# Altium PCB Kasli-DIOT.PCBDOC (part 23 of 23)
Units mm, origin at the board's own origin, x right, y up, seen from the top; angles counter-clockwise.
Board outline 222.9 x 100 mm, 10 copper layers (TopLayer, Layer 2, Layer 3, Layer 4, Layer 5, Layer 6, Layer 7, layer 8, Layer 9, BottomLayer), stack 1.564 mm thick; 977 components, 900 nets, 4676 pads, 2725 vias.
Unrouted connection lines stored in the file: 17.
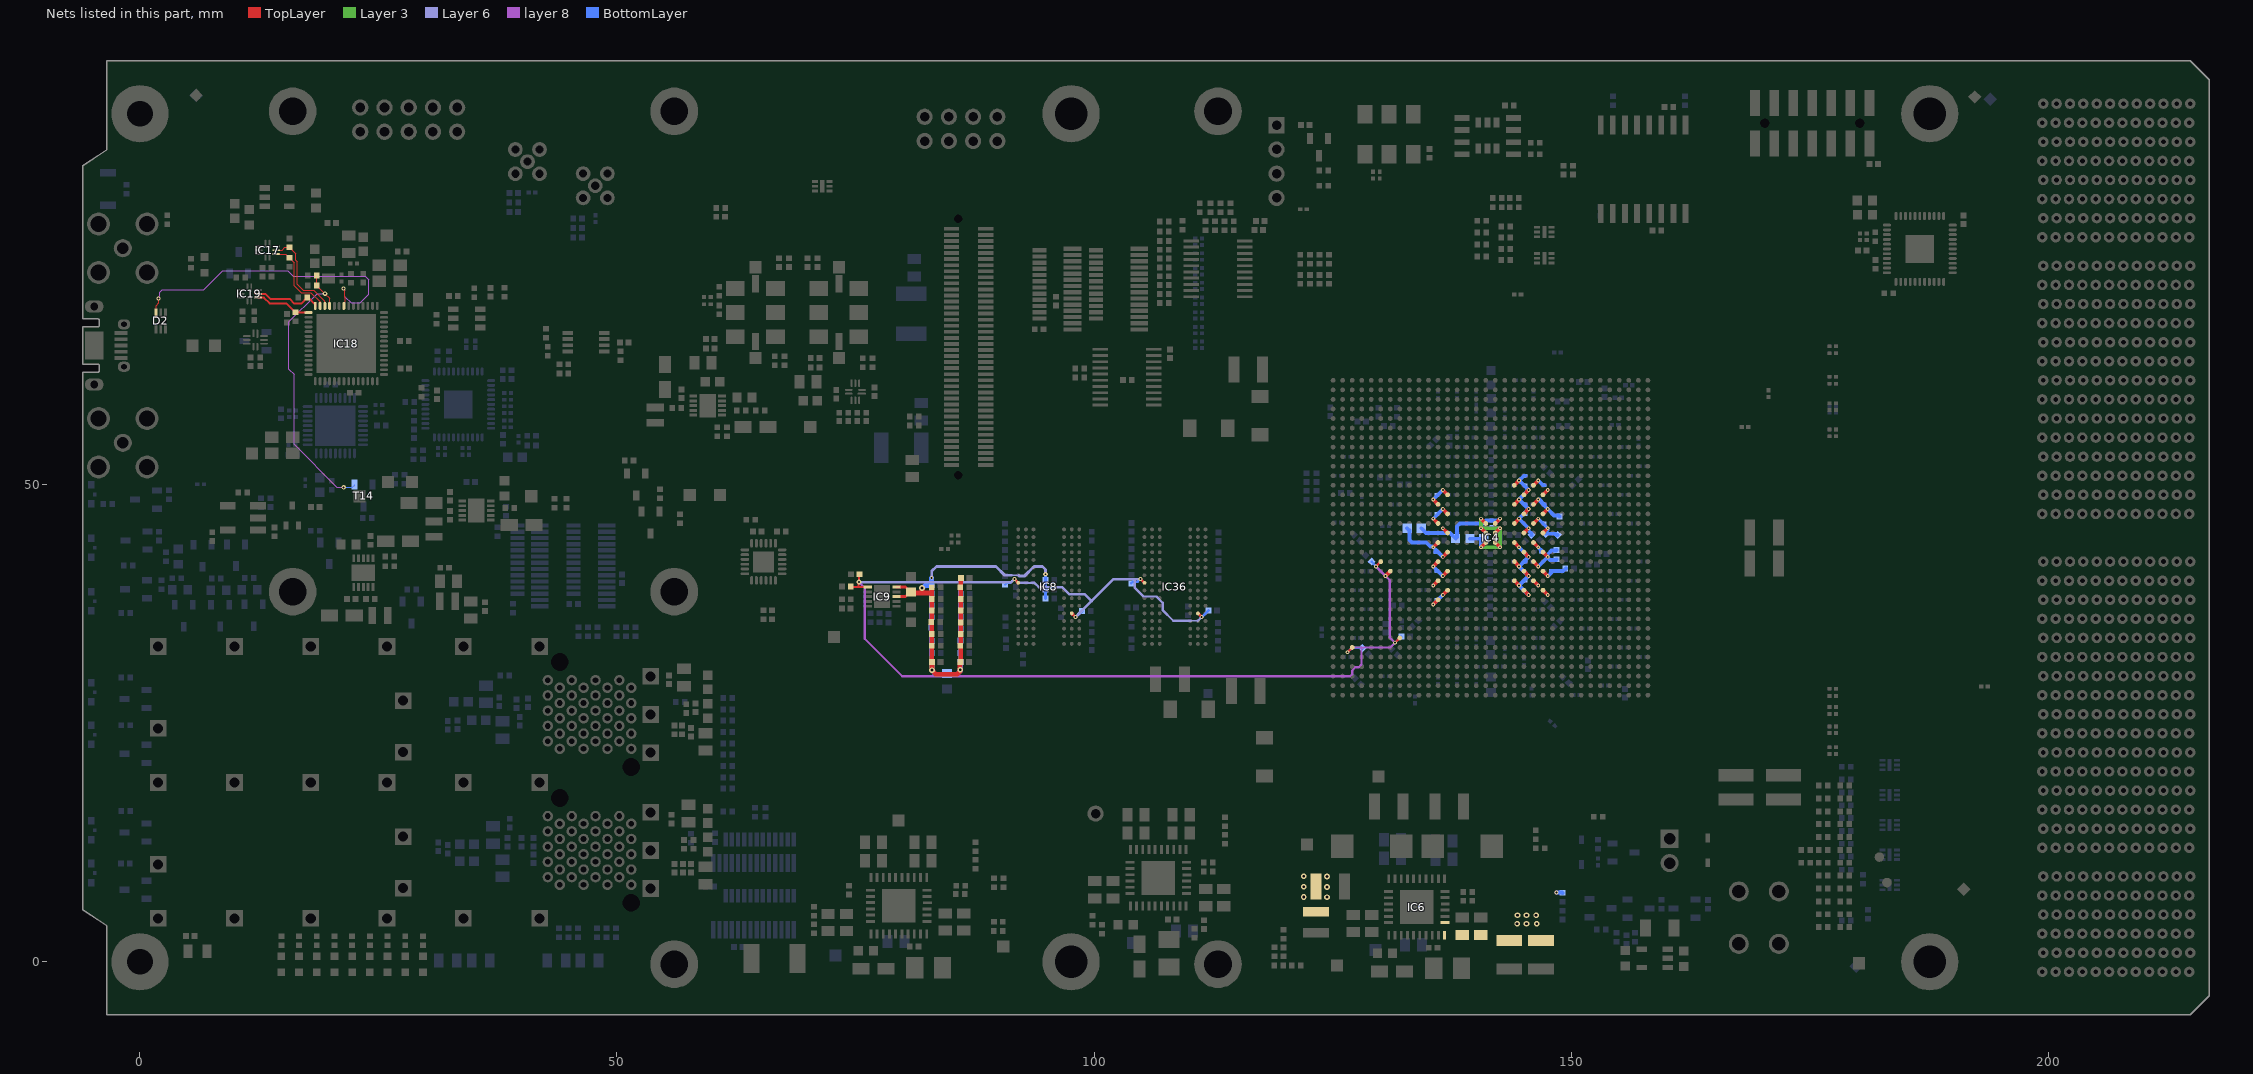
[diagram p29: the nets of this part, all layers, seen from the top]

## Via types
v1: diameter 0.4, hole 0.2, TopLayer to BottomLayer, tented both sides, 1723 vias
v2: diameter 0.5, hole 0.2, TopLayer to BottomLayer, tented both sides, 524 vias
v3: diameter 0.6, hole 0.3, TopLayer to BottomLayer, tented both sides, 172 vias
v4: diameter 0.6, hole 0.3, TopLayer to BottomLayer, 113 vias
v5: diameter 0.5, hole 0.2, TopLayer to BottomLayer, 107 vias
v6: diameter 0.4, hole 0.2, TopLayer to BottomLayer, 67 vias
v7: diameter 0.5, hole 0.25, TopLayer to BottomLayer, tented both sides, 12 vias
v8: diameter 0.8, hole 0.5, TopLayer to BottomLayer, tented both sides, 7 vias

## Nets (pads, with @x,y where several pads share a name; then routed paths per layer and width w, separated by ;. In a path a pad name is that pad's centre, name@x,y a point inside that pad or via, vN(x,y) a via of type N, cw(c..) or ccw(c..) an arc to the next point about the centre after c; other vN are vias at no path point) (continued)
USB_D_R_P: D2.6 IC18.8 | length 33.2
  TopLayer w0.129: D2.6@1.681,67.984 1.681,68.792 1.961,69.071 1.961,69.496 v6(1.926,69.531) ; v1(21.321,70.574) 21.321,70.528 21.487,70.363 21.487,69.686 21.498,69.675 21.498,69.194 21.376,69.072 IC18.8@21.376,68.758
  layer 8 w0.102: v6(1.926,69.531) 1.926,69.604 2.061,69.739 2.061,70.184 2.331,70.454 6.69,70.454 8.665,72.429 15.506,72.429 16.085,71.85 23.631,71.85 23.99,71.491 23.99,69.978 23.083,69.071 22.135,69.071 21.486,69.72 21.486,70.365 21.321,70.53 v1(21.321,70.574)
USB_TCK: IC17.9 IC18.12 R195.1 | length 9.8
  TopLayer w0.125: IC17.9@14.271,74.587 14.895,74.587 15.187,74.879 R195.1@15.657,74.879 16.336,74.2 16.336,73.55 16.486,73.4 16.486,71.041 17.131,70.396 18.197,70.396 19.376,69.217 IC18.12@19.376,68.758
USB_TDI_DO: IC17.8 IC18.13 R196.1 | length 8.5
  TopLayer w0.125: IC17.8@14.271,74.187 15.257,74.187 R196.1@15.657,73.787 16.186,73.258 16.186,70.883 16.927,70.142 17.898,70.142 18.876,69.164 IC18.13@18.876,68.758
USB_TDO_DI: IC18.14 IC19.9 R197.1 | length 7.1
  TopLayer w0.2: IC19.9@12.366,70.015 13.121,70.015 13.658,69.478 15.686,69.478 16.165,68.999 16.889,68.999 R197.1@17.524,69.634 17.627,69.634 18.376,68.885 IC18.14@18.376,68.758
USB_TMS: IC18.15 IC19.8 R198.1 | length 6
  TopLayer w0.2: IC19.8@12.366,69.615 12.99,69.615 13.58,69.025 15.339,69.025 R198.1@16.292,68.072 16.306,68.058 IC18.15@17.676,68.058
VCCAUX: C55.2 C98.2 C117.2 C118.2 C119.2 C151.2 C152.2 C158.2 C235.2 C240.2 C313.2 C314.2 C368.2 C369.2 C370.2 C371.2 C372.2 IC4.AA13 IC4.AA23 IC4.AB12 IC4.AB22 IC4.AC13 IC4.AC23 IC4.AD12 IC4.M22 IC4.N13 IC4.N23 IC4.P12 IC4.P22 IC4.R13 IC4.R23 IC4.T12 IC4.T22 IC4.U13 IC4.U23 IC4.V12 IC4.V22 IC4.W13 IC4.W23 IC4.Y12 IC4.Y22 L4.1 L7.2 | length 44.1
  TopLayer w0.4: v1(135.561,37.45) IC4.AD12@136.061,37.95 ; v1(135.561,39.45) IC4.AB12@136.061,39.95 ; v1(135.561,41.45) IC4.Y12@136.061,41.95 ; v1(135.561,43.45) IC4.V12@136.061,43.95 ; v1(135.561,46.45) IC4.T12@136.061,45.95 ; v1(135.561,48.45) IC4.P12@136.061,47.95 ; v1(136.561,38.45) IC4.AC13@137.061,38.95 ; v1(136.561,40.45) IC4.AA13@137.061,40.95 ; v1(136.561,42.45) IC4.W13@137.061,42.95 ; v1(136.561,45.45) IC4.U13@137.061,44.95 ; v1(136.561,47.45) IC4.R13@137.061,46.95 ; v1(136.561,49.45) IC4.N13@137.061,48.95 ; IC4.AB22@146.061,39.95 v1(146.561,39.45) ; IC4.Y22@146.061,41.95 v1(146.561,41.45) ; IC4.V22@146.061,43.95 v1(146.561,43.45) ; IC4.T22@146.061,45.95 v1(146.561,46.45) ; IC4.P22@146.061,47.95 v1(146.561,48.45) ; IC4.M22@146.061,49.95 v1(146.561,50.45) ; IC4.AC23@147.061,38.95 v1(147.561,38.45) ; IC4.AA23@147.061,40.95 v1(147.561,40.45) ; IC4.W23@147.061,42.95 v1(147.561,42.45) ; IC4.U23@147.061,44.95 v1(147.561,45.45) ; IC4.R23@147.061,46.95 v1(147.561,47.45) ; IC4.N23@147.061,48.95 v1(147.561,49.45)
  BottomLayer w0.4: L4.1@132.811,45.45 133.061,45.2 133.061,44.21 133.321,43.95 134.827,43.95 135.237,43.54 135.471,43.54 v1(135.561,43.45) C118.2@135.936,43.075 ; v1(135.561,37.45) v1(136.561,38.45) ; v1(135.561,41.45) v1(136.561,40.45) 136.528,40.45 136.361,40.617 136.028,40.95 C119.2@135.911,40.95 ; v1(135.561,46.45) v1(136.561,47.45) ; v1(135.561,48.45) v1(136.561,49.45) ; C118.2@135.811,42.95 136.061,42.95 136.361,42.65 v1(136.561,42.45) ; v1(146.561,41.45) v1(147.561,42.45) ; v1(146.561,43.45) 146.711,43.3 146.861,43.15 146.861,42.975 C369.2@146.886,42.975 ; v1(146.561,46.45) v1(147.561,45.45) 147.561,45.231 147.354,45.024 C152.2@147.354,44.868 148.324,44.868 148.449,44.743 C151.2@148.604,44.743 ; v1(146.561,50.45) 147.061,49.95 C372.2@147.211,49.95 ; C371.2@147.211,47.95 147.186,47.95 146.686,48.45 v1(146.561,48.45) v1(147.561,47.45) 148.226,46.785 148.676,46.785 C314.2@148.786,46.675 ; v1(147.561,40.45) 147.609,40.45 147.911,40.752 C368.2@147.911,40.95 149.189,40.95 C240.2@149.46,41.221 ; C158.2@148.486,42.2 148.411,42.125 147.811,42.125 147.561,42.375 v1(147.561,42.45) ; C313.2@148.486,43.175 148.421,43.11 147.942,43.11 147.561,42.729 v1(147.561,42.45)
  other v3: 124.411,6.775 121.986,6.8 124.411,7.85 121.986,7.875 124.411,8.95 121.986,8.975
VCCBRAM: C56.2 C99.2 C120.2 C121.2 C122.2 C132.2 C133.2 C145.2 C351.2 C353.2 C354.2 IC4.AA21 IC4.AB20 IC4.AC21 IC4.M20 IC4.N21 IC4.P20 IC4.R21 IC4.T20 IC4.U21 IC4.V20 IC4.W21 IC4.Y20 IC6.1 IC6.32 R31.2 | length 25.1
  TopLayer w0.4: IC4.AB20@144.061,39.95 v1(144.561,39.45) ; IC4.Y20@144.061,41.95 v1(144.561,41.45) ; IC4.V20@144.061,43.95 v1(144.561,43.45) ; IC4.T20@144.061,45.95 v1(144.561,46.45) ; IC4.P20@144.061,47.95 v1(144.561,48.45) ; IC4.M20@144.061,49.95 v1(144.561,50.45) ; IC4.AC21@145.061,38.95 v1(145.561,38.45) ; IC4.AA21@145.061,40.95 v1(145.561,40.45) ; IC4.W21@145.061,42.95 v1(145.561,42.45) ; IC4.U21@145.061,44.95 v1(145.561,45.45) ; IC4.R21@145.061,46.95 v1(145.561,47.45) ; IC4.N21@145.061,48.95 v1(145.561,49.45)
  BottomLayer w0.4: v1(144.561,43.45) v1(145.561,42.45) 145.236,42.125 145.236,41.95 C122.2@145.211,41.95 145.072,41.95 144.572,41.45 v1(144.561,41.45) v1(145.561,40.45) v1(144.561,39.45) v1(145.561,38.45) ; C99.2@145.211,47.95 C99.2@145.236,47.95 ; C354.2@145.236,50.95 145.061,50.95 v1(144.561,50.45) 145.06,49.951 145.06,49.949 145.558,49.45 v1(145.561,49.45) v1(144.561,48.45) v1(145.561,47.45) v1(144.561,46.45) v1(145.561,45.45) 145.561,45.192 145.854,44.899 C145.2@145.854,44.743 ; v1(148.486,7.25) 149.086,7.25 R31.2@149.111,7.225
  other v3: 144.356,3.987 145.331,3.987 146.415,3.987 144.392,4.876 145.342,4.876 146.342,4.876
VREF_DDR3: C162.2 C163.2 C164.2 C165.2 C166.2 C167.2 C168.2 C169.2 C177.2 IC4.AA7 IC4.AH8 IC4.AJ3 IC4.Y6 IC8.H1 IC8.M8 IC9.6 IC36.H1 IC36.M8 | length 136.5
  TopLayer w0.2: C177.2@74.455,39.275 75.33,39.275 ; v2@75.33,39.775 75.33,39.275 ; v2(75.355,39.8) 75.355,40.544 C162.2@75.436,40.625 ; IC9.6@76.28,39.275 75.33,39.275
  TopLayer w0.24: v1(126.561,32.45) IC4.AJ3@127.061,32.95 ; v1(129.561,41.45) IC4.Y6@130.061,41.95 ; v1(131.561,33.45) IC4.AH8@132.061,33.95
  TopLayer w0.3: v1(91.661,40.122) IC8.H1@92.061,39.722 ; IC8.M8@97.661,36.528 v1(98.061,36.128) ; v1(104.886,40.122) IC36.H1@105.286,39.722 ; IC36.M8@110.886,36.528 v1(111.286,36.128)
  TopLayer w0.4: v1(130.561,40.45) IC4.AA7@131.061,40.95
  Layer 6 w0.2: 93.063,39.723 93.428,39.723 ; 110.15,35.747 110.892,35.747
  Layer 6 w0.254: v2(75.355,39.8) 91.339,39.8 v1(91.661,40.122) 92.063,39.72 93.06,39.72 ; 93.428,39.723 93.43,39.725 93.761,39.725 94.211,39.275 96.661,39.275 97.392,38.544 99.017,38.544 99.747,37.814 ; v1(98.061,36.128) 99.747,37.814 ; 104.286,40 104.286,39.2 105.194,38.292 106.543,38.292 107.195,37.64 107.195,36.866 108.311,35.75 110.136,35.75 110.145,35.741 ; v1(104.886,40.122) 102.056,40.122 99.747,37.814 ; 110.892,35.747 111.273,36.128 v1(111.286,36.128)
  layer 8 w0.24: v2(75.355,39.8) 75.961,39.194 75.961,33.863 79.899,29.925 126.834,29.925 127.06,30.152 127.06,30.543 127.387,30.87 127.749,30.87 128.036,31.157 128.036,32.95 ; v1(126.561,32.45) 126.591,32.45 127.091,32.95 128.036,32.95 ; v1(129.561,41.45) v1(130.561,40.45) 131.008,40.003 131.008,34.003 v1(131.561,33.45) 131.061,32.95 128.036,32.95
  BottomLayer w0.24: C164.2@90.686,39.55 90.876,39.74 91.257,39.74 91.639,40.122 v1(91.661,40.122) ; C166.2@103.915,39.675 104.092,39.851 104.585,39.851 104.856,40.122 v1(104.886,40.122) ; v1(126.561,32.45) 127.019,32.908 128.005,32.908 C168.2@128.105,32.808 ; C163.2@129.104,41.957 129.104,41.932 129.561,41.475 v1(129.561,41.45) ; v1(131.561,33.45) 132.03,33.919 132.032,33.919 C167.2@132.222,34.109
  BottomLayer w0.3: v1(98.061,36.128) 98.071,36.137 98.123,36.137 C169.2@98.761,36.775 ; v1(111.286,36.128) 111.296,36.137 111.323,36.137 C165.2@112.011,36.825
VTT_DDR3: C173.2 C174.2 C471.2 C472.2 C473.2 C474.2 C475.2 C476.2 C477.2 C478.2 IC9.3 IC9.5 R101.2 R102.2 R103.2 R104.2 R105.2 R106.2 R107.2 R108.2 R109.2 R110.2 R111.2 R112.2 R113.2 R114.2 R115.2 R116.2 R117.2 R118.2 R119.2 R120.2 R121.2 R122.2 R123.2 R124.2 R126.2 R298.2 | length 68.8
  TopLayer w0.3: IC9.3@79.28,38.275 80.251,38.275 C174.2@80.747,38.771 ; IC9.5@79.28,39.275 80.242,39.275 C174.2@80.747,38.771 ; C174.2@80.797,38.771 C174.2@80.747,38.771
  TopLayer w0.5: C174.2@80.797,38.771 80.917,38.65 81.958,38.65 ; v3(81.961,39.175) 81.958,39.172 81.958,38.65 ; R118.2@82.971,39.26 82.999,39.232 82.999,38.65 ; C477.2@86.051,40.212 86.033,40.194 86.033,31.459 C472.2@86.014,31.441 85.954,31.381 85.954,30.444 85.661,30.15 83.383,30.15 83.383,30.189 83.027,30.545 v3(83.027,30.572) C475.2@83.027,31.431 82.999,31.459 82.999,38.65 ; 81.958,38.65 82.999,38.65
  Layer 6 w0.2: 91.361,40.524 91.493,40.524 91.495,40.522 92.089,40.522 92.111,40.5
  Layer 6 w0.3: v1(82.986,40.25) 82.986,40.95 83.486,41.45 89.711,41.45 90.637,40.524 91.361,40.524 ; 92.111,40.5 92.188,40.423 92.692,40.423 93.719,41.45 94.586,41.45 94.911,41.125 v5(94.911,40.625)
  BottomLayer w0.3: v5(94.911,40.625) 94.924,40.612 94.924,40.013 C471.2@94.936,40 94.926,39.99 94.926,38.085 R298.2@94.916,38.075
  BottomLayer w0.5: v3(81.961,39.175) 81.988,39.175 82.255,39.442 82.912,39.442 C473.2@82.972,39.502 ; C473.2@82.972,39.502 C473.2@82.972,39.502 ; v1(82.986,40.25) 82.971,40.235 C473.2@82.972,39.502 ; C476.2@86.051,40.212 86.033,40.194 86.033,31.459 C478.2@86.014,31.441 86.014,30.504 85.661,30.15 83.383,30.15 83.046,30.487 83.046,30.553 v3(83.027,30.572) 83.027,31.376 82.999,31.404 82.999,32.352 R115.2@82.971,32.38 R119.2@82.971,37.36 R111.2@82.971,38.605 C473.2@82.972,39.502
  other v3: 85.982,30.611
VUSB_PRESENT: IC18.11 R200.2 R201.2 T14.1 | length 30.2
  TopLayer w0.125: R201.2@18.54,71.92 18.54,70.884 19.389,70.035 v2(19.392,70.035) 19.876,69.551 IC18.11@19.876,68.758
  layer 8 w0.125: v2(19.392,70.035) 18.571,70.035 15.611,67.075 15.611,62.125 16.161,61.575 16.161,54.225 20.649,49.738 v2(21.348,49.738)
  BottomLayer w0.125: v2@21.348,49.702 v2(21.348,49.738) 22.248,49.738 22.486,49.975 T14.1@22.486,50.025
XADC_GND: C51.1 C339.1 IC4.T17 IC4.U17 IC4.U18 IC4.V17 IC4.V18 L5.2 | length 15
  TopLayer w0.4: v1(140.561,43.45) IC4.V17@141.061,43.95 ; v1(140.561,45.45) IC4.U17@141.061,44.95 ; v1(140.561,46.45) IC4.T17@141.061,45.95 ; IC4.V18@142.061,43.95 v1(142.561,43.45) ; IC4.U18@142.061,44.95 v1(142.561,45.45)
  Layer 3 w0.4: v1(140.561,43.45) v1(142.561,43.45) v1(142.561,45.45) v1(140.561,45.45) v1(140.561,46.45)
  BottomLayer w0.4: C339.1@139.411,44.35 L5.2@140.861,44.35 140.561,44.05 v1(140.561,43.45) ; v1(140.561,45.45) v1(142.561,45.45)
XADC_VCC: C51.2 C339.2 IC4.T18 L4.2 | length 11
  TopLayer w0.4: IC4.T18@142.061,45.95 v1(142.561,46.45)
  BottomLayer w0.4: L4.2@134.311,45.45 134.811,44.95 137.311,44.95 C339.2@137.911,44.35 138.061,44.5 138.061,45.657 138.354,45.95 140.768,45.95 141.073,46.255 C51.2@141.657,46.255 142.366,46.255 v1(142.561,46.45)
pads on no net: D1.3 D4.5 D6.5 D15.6 FTG1.1 FTG2.1 FTG3.1 FTG4.1 FTG5.1 FTG6.1 IC1.1 IC1.7 IC1.8 IC1.11 IC1.13 IC1.21 IC1.28 IC1.33 IC2.2 IC2.3 IC2.4 IC2.9 IC2.11 IC2.12 IC2.13 IC2.14 IC2.15 IC2.27 IC2.30 IC2.33 IC2.34 IC2.35 IC3.4 IC4.A2 IC4.A3 IC4.A4 IC4.A5 IC4.A7 IC4.A8 IC4.A9 IC4.A10 IC4.A25 IC4.A27 IC4.A28 IC4.A29 IC4.A30 IC4.A32 IC4.A33 IC4.A34 IC4.AA4 IC4.AB11 IC4.AC11 IC4.AD8 IC4.AD9 IC4.AD10 IC4.AD11 IC4.AD23 IC4.AE6 IC4.AE8 IC4.AE10 IC4.AE11 IC4.AF4 IC4.AF7 IC4.AF9 IC4.AF10 IC4.AF12 IC4.AF24 IC4.AG7 IC4.AG9 IC4.AG10 IC4.AG11 IC4.AG12 IC4.AH9 IC4.AH11 IC4.AJ5 IC4.AJ24 IC4.AJ25 IC4.AJ26 IC4.AJ30 IC4.AK11 IC4.AK25 IC4.AK26 IC4.AK27 IC4.AK31 IC4.AL24 IC4.AL25 IC4.AL27 IC4.AM4 IC4.AM25 IC4.AM26 IC4.AN26 IC4.AN31 IC4.AP25 IC4.AP26 IC4.AP31 IC4.B1 IC4.B2 IC4.B4 IC4.B5 IC4.B6 IC4.B7 IC4.B9 IC4.B10 IC4.B11 IC4.B25 IC4.B26 IC4.B27 IC4.B29 IC4.B30 IC4.B31 IC4.B32 IC4.B34 IC4.C1 IC4.C2 IC4.C3 IC4.C4 IC4.C6 IC4.C7 IC4.C8 IC4.C9 IC4.C11 IC4.C26 IC4.C27 IC4.C28 IC4.C29 IC4.C31 IC4.C32 IC4.C33 IC4.C34 IC4.D1 IC4.D3 IC4.D4 IC4.D5 IC4.D6 IC4.D8 IC4.D9 IC4.D10 IC4.D11 IC4.D24 IC4.D25 IC4.D26 IC4.D28 IC4.D29 IC4.D30 IC4.D31 IC4.D33 IC4.D34 IC4.E1 IC4.E2 IC4.E3 IC4.E5 IC4.E6 IC4.E7 IC4.E8 IC4.E10 IC4.E11 IC4.E25 IC4.E26 IC4.E27 IC4.E28 IC4.E30 IC4.E31 IC4.E32 IC4.E33 IC4.F4 IC4.F5 IC4.F7 IC4.F8 IC4.F9 IC4.F10 IC4.F24 IC4.F25 IC4.F27 IC4.F28 IC4.F29 IC4.F30 IC4.F32 IC4.F33 IC4.F34 IC4.G14 IC4.G20 IC4.H12 IC4.H14 IC4.H20 IC4.L7 IC4.L23 IC4.M4 IC4.M5 IC4.M6 IC4.M7 IC4.M9 IC4.M26 IC4.N3 IC4.P6 IC4.P9 IC4.R3 IC4.R7 IC4.R11 IC4.T2 IC4.T3 IC4.T4 IC4.T5 IC4.T24 IC4.U2 IC4.U7 IC4.U24 IC4.V24 IC4.V31 IC4.V32 IC4.V33 IC4.V34 IC4.W5 IC4.W24 IC4.W25 IC4.W28 IC4.W29 IC4.Y11 IC4.Y25 IC4.Y26 IC4.Y28 IC8.J1 IC8.J9 IC8.L1 IC8.L9 IC8.M7 IC10.4 IC11.4 IC16.3 IC16.4 IC16.5 IC16.6 IC16.11 IC16.12 IC16.13 IC18.17 IC18.18 IC18.19 IC18.20 IC18.25 IC18.26 IC18.29 IC18.30 IC18.34 IC18.35 IC18.37 IC18.38 IC18.39 IC18.40 IC18.54 IC24.11 IC24.14 IC24.19 IC25.11 IC25.14 IC25.19 IC26.4 IC31.7 IC33.1 IC33.11 IC33.13 IC33.19 IC33.20 IC33.21 IC33.24 IC33.25 IC33.28 IC33.33 IC33.35 IC33.36 IC34.1 IC34.2 IC34.3 IC34.4 IC34.11 IC34.14 IC34.19 IC34.20 IC34.28 IC36.J1 IC36.J9 IC36.L1 IC36.L9 IC36.M7 IC37.4 IC38.1 IC38.11 IC38.13 IC38.14 IC38.15 IC38.16 J5.16 J5.22 J5.24 J5.28 J5.30 J5.34 J5.36 J5.38 J5.40 J5.44 J5.46 J5.48 J5.50 J5.62 J5.73 J5.75 J5.P1 J5.P2 J8.12 J8.14 J8.15 J8.16 J14.E4 J14.F4 J14.K2 J19.MECH1 J19.MECH2 J19.MECH3 J19.MECH4 J23.4 J23.PastePad J33.A1 J33.B1 J33.B2 J33.C2 J33.D1 J33.E1 J33.E2 J33.F2 J33.G1 J33.H1 J33.H2 J33.I2 J33.J1 J33.K1 J33.K2 J33.L2 LD11.3 LD13.3 LD14.3 LD15.3 LD16.3 LD17.3 LD18.3 OSC2.1

## Polygon pours and split planes (outlines as drawn)
no net on TopLayer "Copper_balancing" (solid, pour order 466): -3.089,93.175 216.2,93.175 216.95,92.425 216.95,-3.31 -3.089,-3.31 -3.089,2.625 -5.389,4.925 -5.389,82.8 -3.089,85.1
P12V0 on TopLayer "P12V0_L01_P351" (solid, remove dead copper, pour order 351): 175.7,1.875 174.063,3.512 174.063,8.288 173.298,9.054 165.879,9.054 163.461,6.636 163.461,2.312 163.461,-2.625 215.886,-2.625 215.911,-2.65 215.911,0.95 198.8,0.95 195.175,4.574 185.096,4.574 182.397,1.875
P2V5_LDO on TopLayer "P2V5_LDO_L01_P398" (solid, remove dead copper, pour order 398): 60.011,61.8 60.011,60.05 60.761,59.3 60.761,58.8 64.011,58.8 64.261,58.55 65.511,58.55 66.261,57.8 70.511,57.8 70.511,59.8 67.761,59.8 65.761,61.8
P3V3_USB on TopLayer "P3V3_USB_L01_P352" (solid, pour order 352): 17.374,81.652 18.92,80.106 19.592,80.106 20.011,79.687 20.011,79.579 20.011,76.55 14.737,76.55 14.737,81.652
NetC202_2 on TopLayer "NETC202_2_L01_P353" (solid, remove dead copper, pour order 353): 14.011,82.8 8.011,82.8 8.011,78.3 14.011,78.3
P1V2 on TopLayer "TopLayer-P1V2" (solid, remove dead copper, pour order 460): 24 vertices, not listed, extent 109.161,4.067 122.686,56.825
P12V0 on TopLayer "P12V0_L01_P426" (solid, remove dead copper, pour order 426): 17 vertices, not listed, extent 76.898,-2.392 82.798,3.375
GND on TopLayer "GND_L01_P465" (solid, pour order 465): 137.386,16.849 137.386,13.449 139.133,11.703 139.133,10.925 140.023,10.035 143.161,10.035 143.636,10.509 143.636,14.397 140.121,17.912 138.449,17.912
P1V0 on TopLayer "P1V0" (solid, remove dead copper, pour order 350): 28 vertices, not listed, extent 130.061,8.242 142.311,27.122
GND on TopLayer "GND_L01_P464" (solid, pour order 464): 127.786,17.95 130.161,17.95 130.561,17.55 130.561,13.759 129.026,12.224 129.026,10.639 128.212,9.825 125.286,9.825 124.411,10.7 124.411,14.575
P12V0 on TopLayer "P12V0_L01_P419" (solid, pour order 419): 17 vertices, not listed, extent 131.186,-2.525 137.086,3.242
P3V3_LDO2 on TopLayer "P3V3_LDO2_L01_P399" (solid, pour order 399): 42.011,46.55 42.325,46.864 42.325,49.736 40.011,52.05 37.011,52.05 37.011,46.55
P12V0 on TopLayer "P12V0_L01_P420" (solid, pour order 420): 21 vertices, not listed, extent 104.098,0.533 109.999,6.3
MGTAVCC on TopLayer "TopLayer-MGTAVCC" (solid, remove dead copper, pour order 338): 22 vertices, not listed, extent 99.761,11.3 112.211,57.925
P3V3_LDO1 on TopLayer "P3V3_LDO1_L01_P400" (solid, pour order 400): 23.318,49.867 24.38,48.805 24.38,47.694 23.536,46.85 23.536,43.49 23.101,43.054 22.207,43.054 21.876,43.385 21.876,44.513 20.214,46.175 19.521,46.175 17.049,48.617 17.049,49.055 17.894,49.867
P1V5 on TopLayer "TopLayer-P1V5" (solid, remove dead copper, pour order 459): 19 vertices, not listed, extent 76.861,4.627 104.461,34
P1V8 on TopLayer "P1V8_L01_P438" (solid, remove dead copper, pour order 438): 131.323,4.259 131.323,3.531 131.019,3.227 131.019,2.062 130.524,1.567 122.419,1.567 121.686,2.3 121.686,3.867 129.774,3.867 130.174,4.267
P5V0_CLK on TopLayer "P5V0_CLK_L01_P454" (solid, remove dead copper, pour order 454): 82.036,4.392 82.036,3.664 82.341,3.36 82.341,2.403 82.908,1.836 87.747,1.836 87.811,1.9 87.811,4 83.586,4 83.186,4.4
GND on TopLayer "GND_L01_P446" (solid, pour order 446): 170.136,46.925 170.136,39.825 173.011,39.825 172.986,46.925
P2V5 on TopLayer "P2V5_L01_P440" (solid, pour order 440): 166.911,46.926 166.911,39.85 169.836,39.85 169.836,46.926
P3V3 on TopLayer "P3V3_L01_P427" (solid, remove dead copper, pour order 427): 77.036,4.392 77.036,3.664 76.731,3.36 76.731,2.403 76.164,1.836 71.325,1.836 71.261,1.9 71.261,4 75.486,4 75.886,4.4
P2V5 on TopLayer "P2V5_L01_P416" (solid, pour order 416): 77.114,8.375 77.161,13.45 81.961,13.45 81.961,8.394
VCCBRAM on TopLayer "VCCBRAM_L01_P418" (solid, remove dead copper, pour order 418): 136.323,5.575 136.323,3.5 136.598,3.225 136.598,2.137 137.511,1.225 148.411,1.225 148.736,1.55 148.736,4.95 148.111,5.575
GND on TopLayer "GND_L01_P417" (solid, remove dead copper, pour order 417): 198.861,47.15 198.861,41.225 216.636,41.225 216.636,47.15
STRIP1 on TopLayer "esd1" (solid, pour order 406): 214.394,-4.55 214.411,-4.55 215.651,-3.31 116.861,-3.31 116.861,-4.55
CHASSIS on TopLayer "NONET_L04_P-001" (solid, remove dead copper, pour order 413): -2.778,-3.389 -2.778,3.29 4.211,3.29 4.211,-3.36
STRIP2 on TopLayer "STRIP2_L01_P408" (solid, pour order 408): 79.794,-4.55 96.861,-4.55 96.861,-3.27 41.861,-3.27 41.861,-4.55
CHASSIS on TopLayer "esd1" (solid, pour order 404): -2.82,-3.27 36.861,-3.27 36.861,-4.5 -2.82,-4.5
no net on BottomLayer "Copper_balancing" (solid, pour order 467): -3.449,92.485 216.59,92.485 216.59,-3.196 -3.449,-3.196 -3.449,3.004 -5.749,5.304 -5.749,82.534 -3.449,84.834
STRIP2 on BottomLayer "esd1" (solid, pour order 403): 79.794,-4.55 96.861,-4.55 96.861,-3.281 41.861,-3.281 41.861,-4.55
P1V0 on BottomLayer "P1V0_L10_P435" (solid, pour order 435): 134.748,16.525 136.378,14.895 136.378,9.791 136.087,9.5 132.186,9.5 131.561,10.125 131.561,14.831 133.255,16.525 133.268,16.525
STRIP1 on BottomLayer "STRIP1_L10_P402" (solid, pour order 402): 214.394,-4.55 214.411,-4.55 215.651,-3.31 116.861,-3.31 116.861,-4.55
GND on BottomLayer "GND_L10_P407" (solid, remove dead copper, pour order 407): 198.861,47.15 198.861,41.225 216.636,41.225 216.636,47.15
CHASSIS on BottomLayer "NONET_L04_P-001" (solid, remove dead copper, pour order 405): -2.778,3.29 -2.778,-3.4 4.211,-3.4 4.211,3.3 4.201,3.3
CHASSIS on BottomLayer "esd1" (solid, pour order 401): -2.82,-3.28 36.861,-3.28 36.861,-4.5 -2.82,-4.5
NetC23_2 on BottomLayer "NETC23_2_L10_P383" (solid, pour order 383): 18.011,54.3 16.292,54.3 16.292,51.55 17.511,50.05 19.511,50.05 21.011,52.3 21.011,53.8
no net on layer 8 "Copper_balancing" (solid, pour order 458): -3.089,93.175 216.2,93.175 216.95,92.425 216.95,-3.31 -3.089,-3.31 -3.089,2.625 -5.389,4.925 -5.389,82.8 -3.089,85.1
P12V0 on layer 8 "layer 8-P12V0" (solid, remove dead copper, pour order 455): 22 vertices, not listed, extent 66.761,-2.275 215.911,9.849
P1V0 on layer 8 "P1V0_L08_P450" (solid, pour order 450): 144.561,49.45 144.561,22.3 138.286,16.025 138.286,11.125 136.911,9.75 132.561,9.75 130.226,12.085 130.226,24.39 131.561,25.725 131.561,49.45
MGTAVTT_G11 on layer 8 "MGTAVTT_G11_L08_P448" (solid, pour order 448): 126.586,61.963 126.586,54.25 147.446,54.25 147.446,61.908
no net on Layer 6 "Copper_balancing" (solid, pour order 462): -3.089,93.175 216.2,93.175 216.95,92.425 216.95,-3.31 -3.089,-3.31 -3.089,2.625 -5.389,4.925 -5.389,82.8 -3.089,85.1
P12V0 on Layer 6 "Layer 6-P12V0" (solid, pour order 461): 26 vertices, not listed, extent 76.836,-2.55 215.986,9.65
P3V3_USB on Layer 6 "P3V3_USB_L06_P434" (solid, pour order 434): 12.011,62.364 12.011,61.142 12.901,60.252 14.113,60.262 16,58.375 45.586,58.375 46.611,59.4 46.611,66.4 40.361,72.65 29.522,72.65 23.822,78.35 10.411,78.35 10.306,64.362 10.306,64.069
P5V0_CLK on Layer 6 "Layer 6-P5V0_CLK" (solid, pour order 457): 41.2,41.403 40.784,40.987 24.536,40.987 24.536,-1.95 76.636,-1.95 76.636,1.835 87.236,1.93 87.236,9.475 76.636,9.475 76.636,9.499 59.349,9.499 55.148,6.77 41.2,6.77
MGTAVTT_G11 on Layer 6 "MGTAVTT_G11_L06_P456" (solid, pour order 456): 116.695,57.45 115.64,58.505 115.626,58.505 115.626,60.31 119.667,64.35 141.069,64.35 141.069,57.45 132.321,57.45 117.265,57.45
P1V0 on Layer 6 "P1V0" (solid, remove dead copper, pour order 415): 131.565,13.125 131.686,19.675 139.391,27.38 141.722,27.38 142.311,26.791 142.311,26.58 142.311,21.7 138.561,17.95 136.511,15.9 136.511,13.125
VCCBRAM on Layer 6 "VCCBRAM_L06_P443" (solid, remove dead copper, pour order 443): 146.561,51.45 146.561,48.45 148.586,48.45 148.586,32.012 149.511,30.625 149.511,3.675 148.911,3.075 141.886,3.075 140.561,4.4 140.561,51.45
no net on Layer 3 "Copper_balancing" (solid, pour order 452): -3.139,92.45 216.9,92.45 216.9,-2.975 -3.139,-2.975 -3.139,2.65 -5.439,4.95 -5.439,82.825 -3.139,85.125
VCCAUX on Layer 3 "VCCAUX_L03_P432" (solid, pour order 432): 134.561,36.425 137.561,36.425 137.561,47.45 134.561,47.45
MGTAVTT_G10 on Layer 3 "MGTAVTT_G10_L03_P425" (solid, pour order 425): 135.561,32.775 135.561,27.45 148.611,27.45 148.611,32.825
no net on Layer 5 "Copper_balancing" (solid, pour order 453): -3.139,93.125 216.225,93.125 216.9,92.45 216.9,-2.975 -3.139,-2.975 -3.139,2.65 -5.439,4.95 -5.439,82.825 -3.139,85.125
MGTAVTT_G11 on Layer 5 "MGTAVTT_G11_L05_P433" (solid, pour order 433): 135.561,61.45 135.561,55.45 147.561,55.45 147.417,55.594 147.417,61.472
P2V5 on Layer 2 (split plane): 203 vertices, not listed, extent -5.49,-5.04 216.389,93.939
P1V5 on Layer 2 (split plane): 41 vertices, not listed, extent 76.438,30.127 134.084,50.198
P12V0 on Layer 2 (split plane): 22 vertices, not listed, extent 66.463,-5.04 216.389,11.743
MGTAVTT_G10 on Layer 2 (split plane): 26 vertices, not listed, extent 114.388,23.527 146.834,32.723
MGTAVCC_G11 on Layer 2 (split plane): 146.459,56.408 146.459,54.492 145.519,53.552 136.153,53.552 135.858,53.847 135.825,53.869 135.786,53.877 113.853,53.877 112.613,55.117 112.613,56.683 113.878,57.948 144.919,57.948
MGTAVCC_G10 on Layer 2 (split plane): 45 vertices, not listed, extent 109.113,24.827 146.831,35.482
GND on Layer 4 (split plane): 177 vertices, not listed, extent -5.49,-5.04 216.389,93.939
P3V3 on Layer 7 (split plane): 242 vertices, not listed, extent -5.49,-5.04 133.859,93.939
P1V5 on Layer 7 (split plane): 40 vertices, not listed, extent 76.338,30.902 134.783,48.798
P12V0 on Layer 7 (split plane): 54 vertices, not listed, extent 66.438,-5.04 216.389,8.723
P2V5 on Layer 7 (split plane): 74 vertices, not listed, extent 99.963,1.152 216.389,93.939
P1V0 on Layer 7 (split plane): 20 vertices, not listed, extent 129.938,8.17 147.459,53.348
VCCAUX on Layer 7 (split plane): 48 vertices, not listed, extent 119.538,2.952 148.484,55.348
GND on Layer 9 (split plane): 177 vertices, not listed, extent -5.49,-5.04 216.389,93.939

## Keep-outs
KeepOutLayer:
  drawing of 8345 lines, arcs and shapes, not listed

## Other copper
TopLayer:
  rectangle net GND: 142.185,-2.1 148.211,-1.06
  rectangle net GND: 138.053,4.55 141.011,5.95
  region net GND: 125.73,9.425 125.73,6.467 127.892,6.467 127.892,9.425
  rectangle net GND: 31.911,56.925 34.811,59.9
  rectangle net GND: 18.361,54.075 22.636,58.225
  rectangle net P3V3: 116.569,78.15 117.842,78.808
  rectangle net VCCAUX: 121.461,4.375 125.061,9.625
  pour cut-out: 78.811,9.4 80.261,9.4 80.261,8.516 80.248,8.503 78.813,8.503
  text ".Layer_Name" at 62.053,-24.552 h1.91 r90
  text "1" at 60.953,-28.907 h2.54
Layer 3:
  text "Signal" at 72.213,-24.552 h1.91 r90
  text "3" at 71.113,-28.907 h2.54
Layer 5:
  text "Signal" at 82.383,-24.552 h1.91 r90
  text "5" at 81.283,-28.907 h2.54
Layer 6:
  text "Signal" at 87.761,-24.552 h1.91 r90
  text "6" at 86.161,-28.85 h2.54
layer 8:
  text "Signal" at 97.661,-24.552 h1.91 r90
  text "8" at 96.361,-28.75 h2.54
BottomLayer:
  rectangle net GND: 184.084,72.55 189.175,77.056
  rectangle net GND: 136.926,9.791 140.911,13.775
  region net GND: 131.086,13.775 126.729,13.775 126.729,9.791 131.086,9.791
  rectangle net GND: 132.012,3.931 135.641,7.547
  rectangle net GND: 58.667,57.12 60.328,59.506
  rectangle net GND: 17.951,61.112 25.619,68.297
  rectangle net GND: 34.211,45.8 36.336,48.625
  rectangle net GND: 75.854,36.995 79.661,39.925
  rectangle net GND: 104.892,6.996 108.562,10.619
  rectangle net GND: 77.754,4.032 81.359,7.708
  rectangle net GND: 63.73,40.235 67.061,43.775
  rectangle net GND: 22.061,39.9 24.711,41.7
  rectangle net P3V3_fused: 82.961,56 87.061,57.55
  text ".Layer_Name" at 107.783,-24.552 h1.91 r90
  text "10" at 105.383,-28.907 h2.54
Layer 4 (plane layer: these items are gaps in the copper):
  text "GND" at 77.293,-24.552 h1.91 r90
  text "4" at 76.193,-28.907 h2.54
Layer 9 (plane layer: these items are gaps in the copper):
  text "GND" at 102.703,-24.552 h1.91 r90
  text "9" at 101.603,-28.907 h2.54
Layer 7 (plane layer: these items are gaps in the copper):
  lines w0.2: 119.436,2.775 119.436,12.5 133.961,27.025 133.961,34.175 ; 120.761,67.972 116.083,67.972 99.861,51.75 99.861,48.9 ; 131.886,7.975 131.986,7.975 129.836,10.125 129.836,15.05 136.911,22.125 136.911,52.525 137.836,53.45 146.111,53.45 146.111,38.9 147.561,37.45 ; 134.561,44.122 132.339,44.122 131.586,44.875 119.011,44.875 118.436,45.45 118.436,48.075 117.636,48.875 99.886,48.875 99.861,48.9 ; 137.511,7.975 138.836,9.3 147.561,18.025 147.561,37.45 ; 99.861,48.9 92.261,48.9 89.961,46.6 89.961,43.025 87.961,41.025 78.361,41.025 76.236,38.9 76.236,35.35 76.236,33.925 79.361,30.8 118.611,30.8 119.336,31.525 125.486,31.525 128.486,31.525 131.311,31.525 134.885,35.099 134.885,38.026 134.561,38.35 134.561,45.975 133.086,47.45 132.561,47.45 132.561,52.45 135.561,55.45 147.561,55.45 148.586,54.425 148.586,38.45 147.586,37.45 147.561,37.45
  lines w0.254: 120.761,67.972 120.761,93.95
  lines w0.4: 66.236,-5.7 66.236,0.55 67.261,1.575 77.961,1.575 79.136,2.75 82.761,2.75 83.936,1.575 87.742,1.575 88.917,2.75 113.88,2.75 126.661,2.75 131.886,7.975 ; 131.986,7.975 137.511,7.975 137.936,7.55 161.401,7.55 162.776,8.925 165.924,8.925 173.427,8.925 174.356,7.996 174.356,5.9 177.335,2.92 179.306,0.95 216.911,0.95
  text "PWR" at 92.461,-24.552 h1.91 r90
  text "7" at 90.961,-28.75 h2.54
Layer 2 (plane layer: these items are gaps in the copper):
  lines w0.2: 109.011,30.025 109.011,25.9 110.186,24.725 114.286,24.725 ; 132.151,35.138 135.421,35.138 135.867,35.584 143.106,35.584 143.19,35.5 146.933,35.5 ; 146.933,32.511 146.933,35.511 ; 114.286,24.725 114.286,23.825 114.686,23.425 115.736,23.425 136.886,23.425 142.911,29.45 146.936,29.45 146.936,32.75 146.861,32.825 145.936,32.825 143.884,30.773 136.289,30.773 135.536,30.02 135.536,28.75 133.061,26.275 120.011,26.275 115.836,26.275 114.286,24.725 ; 76.336,33.3 79.611,30.025 123.061,30.025 124.486,31.45 131.161,31.45 131.936,32.225 131.936,34.275 132.132,34.471 132.132,36.521 133.914,38.303 133.914,38.845 133.914,41.635 134.186,41.907 134.186,46.178 132.654,47.71 120.003,47.71 117.413,50.3 107.811,50.3 105.261,47.75 92.236,47.75 87.096,42.61 80.121,42.61 76.336,38.825 76.336,33.3 ; 112.511,55.075 112.511,56.725 113.836,58.05 120.111,58.05 144.961,58.05 146.561,56.45 146.561,54.45 145.561,53.45 136.111,53.45 135.786,53.775 120.611,53.775 113.811,53.775 112.511,55.075
  lines w0.4: 73.511,-5.5 66.261,-5.5 66.261,1.025 68.836,3.6 140.186,3.6 148.531,11.945 168.666,11.945 173.861,6.75 173.861,1.35 174.286,0.925 216.961,0.925
  text "PWR" at 67.133,-24.552 h1.91 r90
  text "2" at 66.033,-28.907 h2.54

## Silkscreen, mask and mechanical layers (free items; w line width, h text height)
TopOverlay:
  drawing of 282 lines, arcs and shapes, not listed
  text "FPGA JTAG" at 170.636,91.964 h1
  text "DC/DC" at 116.736,90.775 h1
  text "P2V5" at 82.486,90.075 h0.7 r90
  text "TP3" at 85.144,90.075 h0.7 r90
  text "TP2" at 87.803,90.075 h0.7 r90
  text "GND" at 90.461,90.075 h0.7 r90
  text "P3V3" at 121.611,89.15 h0.7
  text "SDA" at 114.963,86.017 h0.7
  text "FPGA / Testpoints / (2.5V IOLVL)" at 72.211,85.625 h0.7
  text "SCL" at 114.963,83.392 h0.7
  text "GND" at 82.211,81.875 h0.7 r90
  text "TP1" at 84.869,81.875 h0.7 r90
  text "TP0" at 87.528,81.875 h0.7 r90
  text "P3V3" at 90.186,81.875 h0.7 r90
  text "Variant" at 140.211,81.5 h1
  text "GND" at 114.963,80.984 h0.7
  text "0" at 139.811,79.85 h1
  text "1" at 140.011,78.287 h1
  text "Main" at 62.761,75.8 h1
  text "Helper" at 70.511,75.8 h1
  text "SCL" at 63.511,74.3 h0.8
  text "SCL" at 72.261,74.3 h0.8
  text "Kasli-DIOT v.P_version" at 153.824,73.925 h1.6
  text "WUT ISE / TS / 2026" at 149.825,71.6 h1.6
  text "3" at 120.486,68.4 h1
  text "2" at 121.914,68.4 h1
  text "1" at 123.341,68.4 h1
  text "0" at 124.436,68.4 h1
  text "PCB_VER" at 127.075,68.4 h1 r90
  text "Rx" at 8.445,61.487 h1 r90
  text "Tx" at 6.095,61.437 h1 r90
  text "SDA" at 71.971,61.245 h0.8
  text "SDA" at 63.361,61.175 h0.8
  text "P2V5" at 67.961,53.45 h1
  text "Shared I2C" at 22.511,52.8 h1
  text "LDO" at 68.761,52.35 h1
  text "3V3" at 57.929,51.775 h1
  text "SW" at 61.429,51.775 h1
  text "SDA" at 24.011,51.3 h1
  text "SCL" at 27.511,51.3 h1
  text "I2C" at 54.429,51.275 h1
  text "SDA" at 56.179,50.275 h1
  text "SCL" at 59.429,50.275 h1
  text "P3V3 / LDO2" at 40.011,50.05 h1
  text "P3V3 LDO1" at 13.363,49.31 h1
  text "P3V3" at 74.136,33.65 h0.7
  text "Licensed under CERN-OHL-W v2 or later / https://github.com/sinara-hw/KASLI-DIOT" at 184.711,21.7 h1.5 r90
  text "DC/DC /  force disable" at 164.251,21.674 h0.7
  text "P1V0" at 128.625,20.825 h0.7
  text "IC23" at 161.561,19.25 h0.7
  text "GND" at 99.25,17.2 h0.7
  text "IC14" at 161.561,16.75 h0.7
  text "P2V5" at 78.211,16.05 h0.7
  text "PWM" at 159.061,15.625 h0.7
  text "P12V0" at 159.061,14.45 h0.7
  text "P1V2" at 121.061,13.725 h0.7
  text "P12V0 / GND" at 165.55,11.025 h2.8
  text "CPCIS SCL" at 183.903,10.847 h0.6
  text "FAN" at 156.98,10.65 h0.7 r90
  text "CPCIS SDA" at 185.45,9.033 h0.6
  text "P12V0" at 177.538,1.956 h0.7
  text "WUT ISE 2024" at 33.711,1.875 h1.02
  text "Designed by FS" at 34.971,0.95 h0.6
  text "P1V5" at 89.241,-0.339 h0.7
  text "1V0" at 34.221,-2.107 h0.8 r90
  text "1V2" at 35.971,-2.107 h0.8 r90
  text "1V5" at 37.821,-2.107 h0.8 r90
  text "1V8" at 39.721,-2.107 h0.8 r90
  text "2V5" at 41.621,-2.107 h0.8 r90
  text "3V3" at 43.471,-2.107 h0.8 r90
  text "LED" at 48.721,-2.157 h0.7 r90
  text "PWR / GOOD" at 32.971,-2.357 h0.7 r90
  text "P1V8" at 124.214,-2.397 h0.7
  text "12V0" at 45.221,-2.607 h0.8 r90
  text "USER" at 49.621,-2.657 h0.7 r90
  text "FPGA / DONE" at 47.619,-2.857 h0.7 r90
  text ".Layer_Name" at 59.286,-33.825 h1.91
BottomOverlay:
  drawing of 272 lines, arcs and shapes, not listed
  text "Licensed under CERN-OHL-W v2 or later / https://github.com/sinara-hw/KASLI-DIOT" at 172.714,80.35 h1.5
  text "Kasli-DIOT v.P_version" at 72.562,50.875 h1.5
  text "WUT ISE / TS / 2026" at 76.5,48.65 h1.5
  text ".Layer_Name" at 109.586,-33.025 h1.91
TopPaste:
  text ".Layer_Name" at 63.386,-36.825 h1.91
BottomPaste:
  text ".Layer_Name" at 105.686,-36.025 h1.91
TopSolder:
  rectangle: -2.516,-4.947 216.28,-3.325
  region: 202.898,46.205 202.898,42.705 216.861,42.705 216.861,46.205
  region: 202.898,46.205 202.898,42.705 216.861,42.705 216.861,46.205
  text ".Layer_Name" at 67.036,-39.925 h1.91
BottomSolder:
  rectangle: 77.742,4.067 81.333,7.686
  rectangle: 104.942,6.992 108.533,10.611
  rectangle: 132.029,3.934 135.621,7.553
  rectangle: -2.516,-4.947 216.28,-3.15
  region: 202.898,46.205 202.898,42.705 216.861,42.705 216.861,46.205
  region: 202.898,46.205 202.898,42.705 216.861,42.705 216.861,46.205
  text ".Layer_Name" at 101.836,-39.125 h1.91
Mechanical1:
  lines w0.15: -6,61.8 -6,5.45 -3.5,3.8 -3.5,-5.55 214.9,-5.55 216.9,-3.55 216.9,92.45 214.9,94.45 -3.5,94.45 -3.5,85.1 -6,83.45 -6,67.4 ; -6,62.65 -6,66.55
  lines w0.254: 63.911,-30.225 63.911,-25.145 ; 68.991,-30.225 68.991,-25.145 ; 74.071,-30.225 74.071,-25.145 ; 84.241,-30.225 84.241,-25.145 ; 89.321,-30.225 89.321,-25.145 ; 94.401,-30.225 94.401,-25.145 ; 99.481,-30.225 104.561,-30.225 ; 99.481,-30.225 99.481,-25.145 ; 99.481,-30.225 99.481,-25.145 ; 99.481,-30.225 79.161,-30.225 79.161,-25.145 99.481,-25.145 ; 99.481,-25.145 104.561,-25.145 ; 104.561,-30.225 109.641,-30.225 109.641,-25.145 104.561,-25.145 ; 104.561,-30.225 104.561,-25.145 ; 58.861,-30.225 79.151,-30.225 79.151,-25.145 58.861,-25.145 58.861,-30.225
Mechanical13:
  lines w0.1: -5.679,-5.55 -5.679,96.558
Mechanical16:
  circle w0.1: c16,89.15 r1.45
  circle w0.1: c56,89.15 r1.45
  circle w0.1: c113,89.15 r1.45
  circle w0.1: c56,38.8 r1.45
  circle w0.1: c16,38.8 r1.45
  circle w0.1: c113,-0.25 r1.45
  circle w0.1: c56,-0.25 r1.45
  circle w0.1: c187.6,0 r1.7
  circle w0.1: c187.6,88.9 r1.7
  circle w0.1: c97.6,0 r1.7
  circle w0.1: c97.6,88.9 r1.7
  circle w0.1: c7.6,0 r1.7
  circle w0.1: c7.6,88.9 r1.7
  circle w0.1: c0,88.9 r1.35
  circle w0.1: c0,0 r1.35
  lines w0.1: 0,1.35 6.153,11.277 ; 16,89.15 16,90.1 ; 56,-1.2 56,-0.25
  text "PCB Origin}" at 6.153,11.277 h1.5

## Text inside footprints (layer, text, board x,y; h text height)
IC4: Mechanical14 "24" at 148.261,62.45 h0.6 r90; Mechanical14 "34" at 158.261,62.45 h0.6 r90; Mechanical14 "33" at 157.261,62.45 h0.6 r90; Mechanical14 "32" at 156.261,62.45 h0.6 r90; Mechanical14 "31" at 155.261,62.45 h0.6 r90; Mechanical14 "30" at 154.261,62.45 h0.6 r90; Mechanical14 "29" at 153.261,62.45 h0.6 r90; Mechanical14 "28" at 152.261,62.45 h0.6 r90; Mechanical14 "27" at 151.261,62.45 h0.6 r90; Mechanical14 "26" at 150.261,62.45 h0.6 r90; Mechanical14 "25" at 149.261,62.45 h0.6 r90; Mechanical14 "23" at 147.261,62.45 h0.6 r90; Mechanical14 "2" at 126.311,62.45 h0.6 r90; Mechanical14 "3" at 127.311,62.45 h0.6 r90; Mechanical14 "4" at 128.311,62.45 h0.6 r90; Mechanical14 "5" at 129.311,62.45 h0.6 r90; Mechanical14 "16" at 140.311,62.45 h0.6 r90; Mechanical14 "15" at 139.311,62.45 h0.6 r90; Mechanical14 "14" at 138.311,62.45 h0.6 r90; Mechanical14 "13" at 137.311,62.45 h0.6 r90; Mechanical14 "12" at 136.311,62.45 h0.6 r90; Mechanical14 "11" at 135.311,62.45 h0.6 r90; Mechanical14 "10" at 134.311,62.45 h0.6 r90; Mechanical14 "9" at 133.311,62.45 h0.6 r90; Mechanical14 "8" at 132.311,62.45 h0.6 r90; Mechanical14 "7" at 131.311,62.45 h0.6 r90; Mechanical14 "6" at 130.311,62.45 h0.6 r90; Mechanical14 "1" at 125.311,62.45 h0.6 r90; Mechanical14 "18" at 142.311,62.45 h0.6 r90; Mechanical14 "19" at 143.311,62.45 h0.6 r90; Mechanical14 "20" at 144.311,62.45 h0.6 r90; Mechanical14 "21" at 145.311,62.45 h0.6 r90; Mechanical14 "22" at 146.261,62.45 h0.6 r90; Mechanical14 "17" at 141.311,62.45 h0.6 r90; Mechanical14 "AB" at 122.661,39.65 h0.6; Mechanical14 "AA" at 122.661,40.65 h0.6; Mechanical14 "Y" at 123.161,41.65 h0.6; Mechanical14 "W" at 123.161,42.65 h0.6; Mechanical14 "V" at 123.161,43.65 h0.6; Mechanical14 "U" at 123.161,44.65 h0.6; Mechanical14 "T" at 123.161,45.65 h0.6; Mechanical14 "R" at 123.161,46.65 h0.6; Mechanical14 "P" at 123.161,47.65 h0.6; Mechanical14 "N" at 123.161,48.65 h0.6; Mechanical14 "M" at 123.161,49.65 h0.6; Mechanical14 "L" at 123.161,50.65 h0.6; Mechanical14 "K" at 123.161,51.65 h0.6; Mechanical14 "J" at 123.161,52.65 h0.6; Mechanical14 "H" at 123.161,53.65 h0.6; Mechanical14 "G" at 123.161,54.65 h0.6; Mechanical14 "F" at 123.161,55.65 h0.6; Mechanical14 "E" at 123.161,56.65 h0.6; Mechanical14 "D" at 123.161,57.65 h0.6; Mechanical14 "C" at 123.161,58.65 h0.6; Mechanical14 "B" at 123.161,59.65 h0.6; Mechanical14 "A" at 123.161,60.65 h0.6; Mechanical14 "AC" at 122.661,38.65 h0.6; Mechanical14 "AD" at 122.661,37.65 h0.6; Mechanical14 "AE" at 122.661,36.65 h0.6; Mechanical14 "AF" at 122.661,35.65 h0.6; Mechanical14 "AG" at 122.661,34.65 h0.6; Mechanical14 "AH" at 122.661,33.65 h0.6; Mechanical14 "AJ" at 122.661,32.65 h0.6; Mechanical14 "AK" at 122.661,31.65 h0.6; Mechanical14 "AL" at 122.661,30.65 h0.6; Mechanical14 "AM" at 122.661,29.65 h0.6; Mechanical14 "AN" at 122.661,28.65 h0.6; Mechanical14 "AP" at 122.661,27.65 h0.6
IC8: Mechanical14 "L" at 90.661,37.125 h0.4; Mechanical14 "K" at 90.661,37.925 h0.4; Mechanical14 "M" at 90.661,36.325 h0.4; Mechanical14 "H" at 90.661,39.525 h0.4; Mechanical14 "G" at 90.661,40.325 h0.4; Mechanical14 "F" at 90.661,41.125 h0.4; Mechanical14 "E" at 90.661,41.925 h0.4; Mechanical14 "D" at 90.661,42.725 h0.4; Mechanical14 "C" at 90.661,43.525 h0.4; Mechanical14 "B" at 90.661,44.325 h0.4; Mechanical14 "N" at 90.661,35.525 h0.4; Mechanical14 "P" at 90.661,34.725 h0.4; Mechanical14 "R" at 90.661,33.925 h0.4; Mechanical14 "J" at 90.661,38.725 h0.4; Mechanical14 "T" at 90.661,33.125 h0.4; Mechanical14 "1" at 91.936,46.6 h0.4; Mechanical14 "2" at 92.736,46.6 h0.4; Mechanical14 "3" at 93.536,46.6 h0.4; Mechanical14 "7" at 96.736,46.6 h0.4; Mechanical14 "8" at 97.536,46.6 h0.4; Mechanical14 "9" at 98.336,46.6 h0.4
IC36: Mechanical14 "L" at 103.886,37.125 h0.4; Mechanical14 "K" at 103.886,37.925 h0.4; Mechanical14 "M" at 103.886,36.325 h0.4; Mechanical14 "H" at 103.886,39.525 h0.4; Mechanical14 "G" at 103.886,40.325 h0.4; Mechanical14 "F" at 103.886,41.125 h0.4; Mechanical14 "E" at 103.886,41.925 h0.4; Mechanical14 "D" at 103.886,42.725 h0.4; Mechanical14 "C" at 103.886,43.525 h0.4; Mechanical14 "B" at 104.025,44.122 h0.4; Mechanical14 "N" at 103.886,35.525 h0.4; Mechanical14 "P" at 103.886,34.725 h0.4; Mechanical14 "R" at 103.886,33.925 h0.4; Mechanical14 "J" at 103.886,38.725 h0.4; Mechanical14 "T" at 103.886,33.125 h0.4; Mechanical14 "1" at 105.161,46.6 h0.4; Mechanical14 "2" at 105.961,46.6 h0.4; Mechanical14 "3" at 106.761,46.6 h0.4; Mechanical14 "7" at 109.961,46.6 h0.4; Mechanical14 "8" at 110.761,46.6 h0.4; Mechanical14 "9" at 111.561,46.6 h0.4
J3: TopOverlay "1" at 175.278,1.043 h1 r180; TopOverlay "4" at 165.879,9.65 h1; Mechanical14 "1" at 175.278,1.043 h1 r180; Mechanical14 "4" at 165.875,9.625 h1
J11: TopOverlay "1" at 194.85,75.6 h1 r90; TopOverlay "2" at 194.85,77.6 h1 r90; TopOverlay "3" at 194.85,79.6 h1 r90; TopOverlay "4" at 194.85,81.6 h1 r90; TopOverlay "5" at 194.85,83.6 h1 r90; TopOverlay "6" at 194.85,85.6 h1 r90; TopOverlay "7" at 194.85,87.6 h1 r90; TopOverlay "8" at 194.85,89.6 h1 r90; DrillDrawing "Diam. 0.5mm +/-0.05" at 198.55,44.785 h1; DrillDrawing "PRESS-FIT TECHNOLOGY" at 198.55,43.285 h1; Mechanical14 "1" at 194.85,75.6 h1 r90; Mechanical14 "L" at 199.9,73.75 h1 r90; Mechanical14 "2" at 194.85,77.6 h1 r90; Mechanical14 "K" at 201.3,73.75 h1 r90; Mechanical14 "J" at 202.7,73.75 h1 r90; Mechanical14 "3" at 194.85,79.6 h1 r90; Mechanical14 "4" at 194.85,81.6 h1 r90; Mechanical14 "I" at 204.1,74 h1 r90; Mechanical14 "H" at 205.5,73.75 h1 r90; Mechanical14 "G" at 206.9,73.75 h1 r90; Mechanical14 "5" at 194.85,83.6 h1 r90; Mechanical14 "6" at 194.85,85.6 h1 r90; Mechanical14 "7" at 194.85,87.6 h1 r90; Mechanical14 "8" at 194.85,89.6 h1 r90; Mechanical14 "F" at 208.3,73.75 h1 r90; Mechanical14 "E" at 209.7,73.75 h1 r90; Mechanical14 "D" at 211.1,73.75 h1 r90; Mechanical14 "C" at 212.5,72.75 h1 r90; Mechanical14 "B" at 213.9,72.75 h1 r90; Mechanical14 "A" at 215.3,72.75 h1 r90; Mechanical8 "Top Surface of Mother Board" at 229.15,78.575 h0.5 r90; Mechanical8 "Edge of Daugher Card" at 217.65,79.725 h0.5 r90
J12: TopOverlay "8" at 194.85,60.6 h1 r90; TopOverlay "7" at 194.85,58.6 h1 r90; TopOverlay "6" at 194.85,56.6 h1 r90; TopOverlay "5" at 194.85,54.6 h1 r90; TopOverlay "4" at 194.85,52.6 h1 r90; TopOverlay "3" at 194.85,50.6 h1 r90; TopOverlay "2" at 194.85,48.6 h1 r90; TopOverlay "1" at 194.85,46.6 h1 r90; Mechanical14 "A" at 215.3,44.75 h1 r90; Mechanical14 "B" at 213.9,44.75 h1 r90; Mechanical14 "C" at 212.5,44.75 h1 r90; Mechanical14 "D" at 211.1,44.75 h1 r90; Mechanical14 "E" at 209.7,44.75 h1 r90; Mechanical14 "F" at 208.3,44.75 h1 r90; Mechanical14 "8" at 194.85,60.6 h1 r90; Mechanical14 "7" at 194.85,58.6 h1 r90; Mechanical14 "6" at 194.85,56.6 h1 r90; Mechanical14 "5" at 194.85,54.6 h1 r90; Mechanical14 "G" at 206.9,44.75 h1 r90; Mechanical14 "H" at 205.5,44.75 h1 r90; Mechanical14 "I" at 204.1,45 h1 r90; Mechanical14 "4" at 194.85,52.6 h1 r90; Mechanical14 "3" at 194.85,50.6 h1 r90; Mechanical14 "J" at 202.7,44.75 h1 r90; Mechanical14 "K" at 201.3,44.75 h1 r90; Mechanical14 "2" at 194.85,48.6 h1 r90; Mechanical14 "L" at 199.9,44.75 h1 r90; Mechanical14 "1" at 194.85,46.6 h1 r90; Mechanical8 "Edge of Daugher Card" at 217.65,50.725 h0.5 r90; Mechanical8 "Top Surface of Mother Board" at 229.15,49.575 h0.5 r90
J14: TopOverlay "1" at 194.85,-1.4 h1 r90; TopOverlay "L" at 199.9,-3.25 h1 r90; TopOverlay "2" at 194.85,0.6 h1 r90; TopOverlay "K" at 201.3,-3.25 h1 r90; TopOverlay "J" at 202.7,-3.25 h1 r90; TopOverlay "I" at 204.1,-3 h1 r90; TopOverlay "H" at 205.5,-3.25 h1 r90; TopOverlay "G" at 206.9,-3.25 h1 r90; TopOverlay "F" at 208.3,-3.25 h1 r90; TopOverlay "3" at 194.85,2.35 h1 r90; TopOverlay "4" at 194.814,4.425 h1 r90; TopOverlay "5" at 194.836,6 h1 r90; TopOverlay "6" at 194.836,8.525 h1 r90; TopOverlay "E" at 209.7,-3.25 h1 r90; TopOverlay "D" at 211.1,-3.25 h1 r90; TopOverlay "C" at 212.5,-4.25 h1 r90; TopOverlay "B" at 213.9,-4.25 h1 r90; TopOverlay "A" at 215.3,-4.25 h1 r90; Mechanical14 "L" at 199.9,-3.25 h1 r90; Mechanical14 "2" at 194.85,0.6 h1 r90; Mechanical14 "1" at 194.85,-1.4 h1 r90; Mechanical14 "K" at 201.3,-3.25 h1 r90; Mechanical14 "J" at 202.7,-3.25 h1 r90; Mechanical14 "I" at 204.1,-3 h1 r90; Mechanical14 "H" at 205.5,-3.25 h1 r90; Mechanical14 "G" at 206.9,-3.25 h1 r90; Mechanical14 "F" at 208.3,-3.25 h1 r90; Mechanical14 "3" at 194.85,2.6 h1 r90; Mechanical14 "4" at 194.85,4.6 h1 r90; Mechanical14 "5" at 194.85,6.6 h1 r90; Mechanical14 "6" at 194.85,8.6 h1 r90; Mechanical14 "E" at 209.7,-3.25 h1 r90; Mechanical14 "D" at 211.1,-3.25 h1 r90; Mechanical14 "C" at 212.5,-4.25 h1 r90; Mechanical14 "B" at 213.9,-4.25 h1 r90; Mechanical14 "A" at 215.3,-4.25 h1 r90; Mechanical8 "Edge of Daugher Card" at 217.65,0.725 h0.5 r90; Mechanical8 "Top Surface of Mother Board" at 229.15,-0.425 h0.5 r90
J19: DrillDrawing "80x diam. 0.6mm +/-0.05" at 14.25,15.805 h1; DrillDrawing "TECHNOLOGY" at 15.75,11.805 h1; DrillDrawing "30x diam. 1.05mm +/-0.05" at 14.25,9.805 h1; DrillDrawing "PRESS-FIT" at 16.5,13.555 h1; Mechanical14 "T1" at 47.25,30.555 h1; Mechanical14 "B1" at 46,20.305 h1; Mechanical14 "B1" at 46,6.055 h1; Mechanical14 "T1" at 47.25,16.305 h1; Mechanical8 "Component and Trace Keep-Out / Except Cage Chassis Ground" at 7.75,7.055 h1 r90
J21: TopOverlay "1" at 161.733,13.115 h1 r270; Mechanical14 "1" at 161.733,13.115 h1 r270
J23: DrillDrawing "r0.2" at -0.736,62.084 h1 r270; DrillDrawing "1.87" at -6.311,64.959 h1; DrillDrawing "0.85" at -8.916,66.102 h1 r270; Mechanical8 "PCB end" at -7.075,68.9 h0.5 r270
J24: TopOverlay "1" at 35.495,90.046 h1.2 r180; Mechanical14 "1" at 35.495,90.046 h1.2 r180
J29: TopOverlay "8" at 194.85,41.6 h1 r90; TopOverlay "7" at 194.85,39.6 h1 r90; TopOverlay "6" at 194.85,37.6 h1 r90; TopOverlay "5" at 194.85,35.6 h1 r90; TopOverlay "4" at 194.85,33.6 h1 r90; TopOverlay "3" at 194.85,31.6 h1 r90; TopOverlay "2" at 194.85,29.6 h1 r90; TopOverlay "1" at 194.85,27.6 h1 r90; Mechanical14 "A" at 215.3,25.75 h1 r90; Mechanical14 "B" at 213.9,25.75 h1 r90; Mechanical14 "C" at 212.5,25.75 h1 r90; Mechanical14 "D" at 211.1,25.75 h1 r90; Mechanical14 "E" at 209.7,25.75 h1 r90; Mechanical14 "F" at 208.3,25.75 h1 r90; Mechanical14 "8" at 194.85,41.6 h1 r90; Mechanical14 "7" at 194.85,39.6 h1 r90; Mechanical14 "6" at 194.85,37.6 h1 r90; Mechanical14 "5" at 194.85,35.6 h1 r90; Mechanical14 "G" at 206.9,25.75 h1 r90; Mechanical14 "H" at 205.5,25.75 h1 r90; Mechanical14 "I" at 204.1,26 h1 r90; Mechanical14 "4" at 194.85,33.6 h1 r90; Mechanical14 "3" at 194.85,31.6 h1 r90; Mechanical14 "J" at 202.7,25.75 h1 r90; Mechanical14 "K" at 201.3,25.75 h1 r90; Mechanical14 "2" at 194.85,29.6 h1 r90; Mechanical14 "L" at 199.9,25.75 h1 r90; Mechanical14 "1" at 194.85,27.6 h1 r90; Mechanical8 "Edge of Daugher Card" at 217.65,31.725 h0.5 r90; Mechanical8 "Top Surface of Mother Board" at 229.15,30.575 h0.5 r90
J31: TopOverlay "1" at 194.85,62.6 h1 r90; TopOverlay "2" at 194.85,64.6 h1 r90; TopOverlay "3" at 194.85,66.6 h1 r90; TopOverlay "5" at 194.85,70.6 h1 r90; TopOverlay "6" at 194.85,72.6 h1 r90; TopOverlay "4" at 194.85,68.6 h1 r90; Mechanical14 "L" at 199.9,60.75 h1 r90; Mechanical14 "2" at 194.85,64.6 h1 r90; Mechanical14 "1" at 194.85,62.6 h1 r90; Mechanical14 "J" at 202.7,60.75 h1 r90; Mechanical14 "K" at 201.3,60.75 h1 r90; Mechanical14 "3" at 194.85,66.6 h1 r90; Mechanical14 "I" at 204.1,61 h1 r90; Mechanical14 "H" at 205.5,60.75 h1 r90; Mechanical14 "G" at 206.9,60.75 h1 r90; Mechanical14 "4" at 194.85,68.6 h1 r90; Mechanical14 "5" at 194.85,70.6 h1 r90; Mechanical14 "6" at 194.85,72.6 h1 r90; Mechanical14 "E" at 209.7,60.75 h1 r90; Mechanical14 "F" at 208.3,60.75 h1 r90; Mechanical14 "D" at 211.1,60.75 h1 r90; Mechanical14 "B" at 213.9,60.75 h1 r90; Mechanical14 "C" at 212.5,60.75 h1 r90; Mechanical14 "A" at 215.3,60.75 h1 r90; Mechanical8 "Edge of Daugher Card" at 217.65,64.725 h0.5 r90; Mechanical8 "Top Surface of Mother Board" at 229.15,63.575 h0.5 r90